# Altium PCB pcb.PcbDoc
Units mil, origin at the board's own origin, x right, y up, seen from the top; angles counter-clockwise.
Board outline 3858 x 2953 mil, 2 copper layers (Top Layer, Bottom Layer); 27 components, 19 nets, 122 pads, 2 vias.
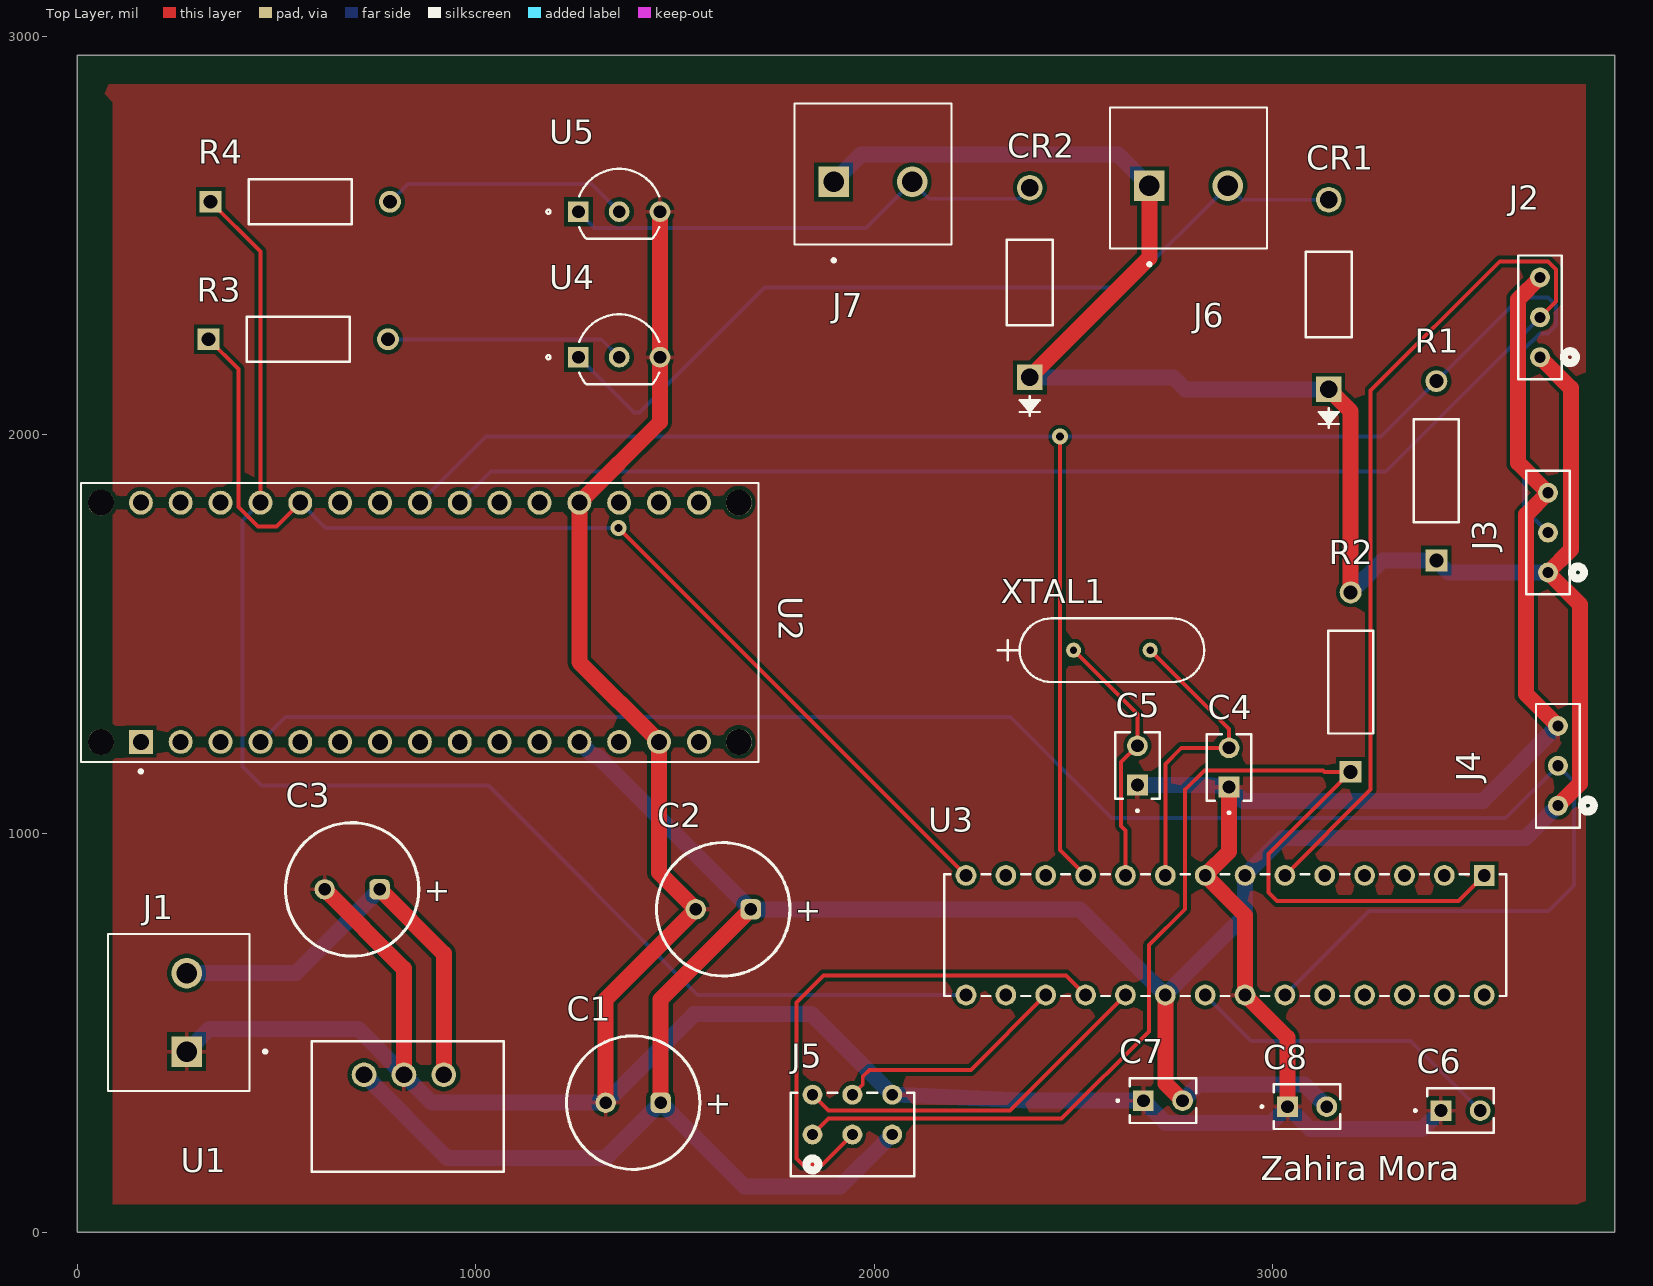
[diagram p0: Top Layer view]
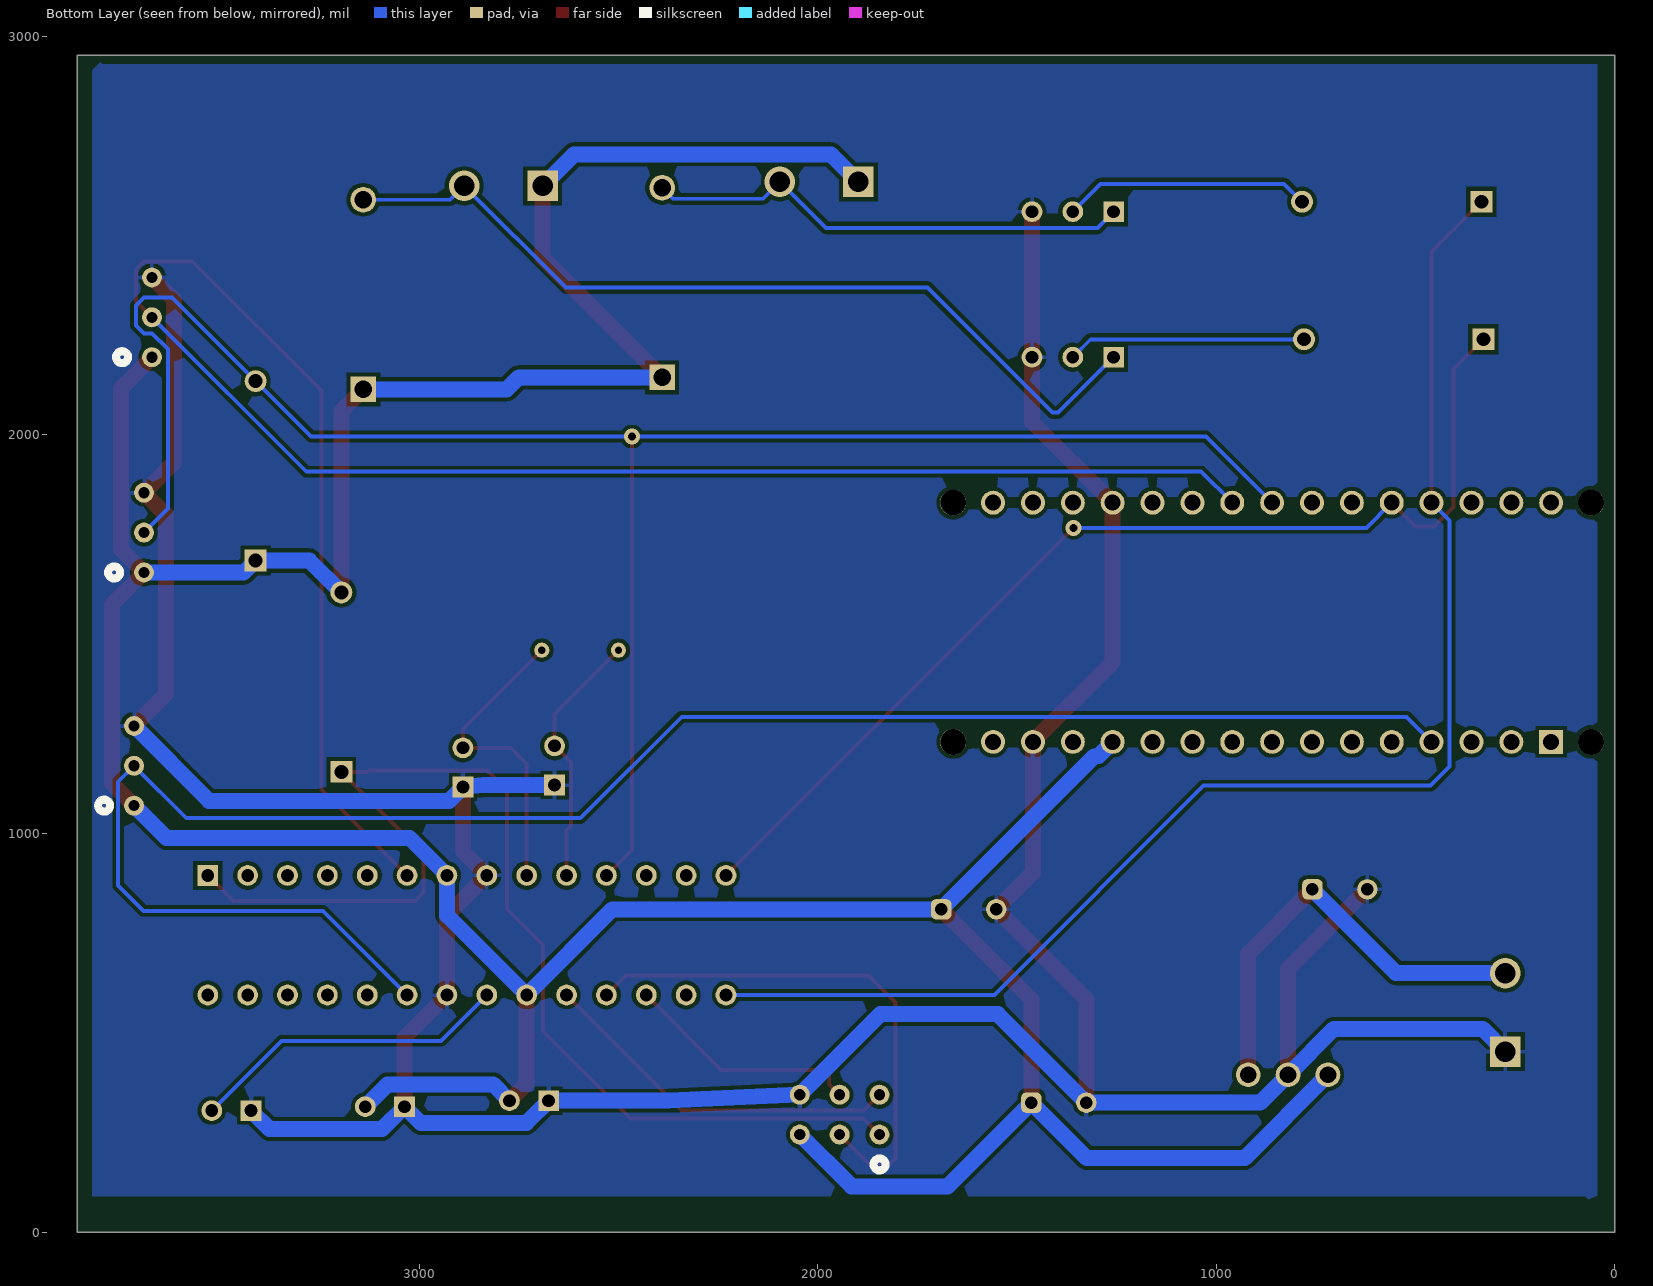
[diagram p1: Bottom Layer view, seen from below]
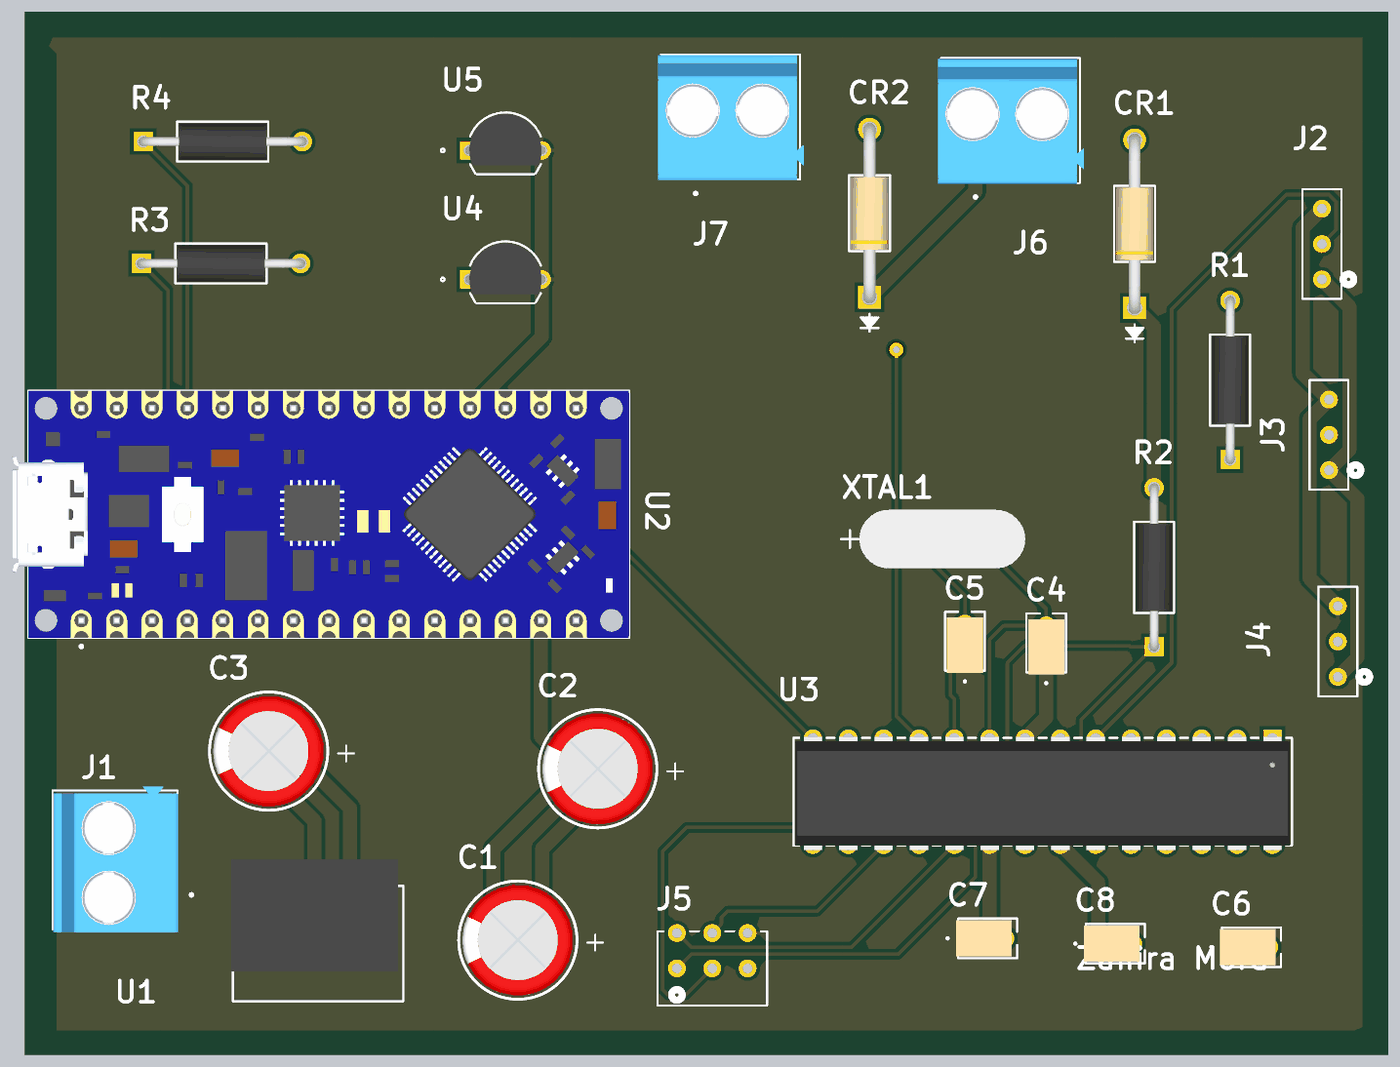
[diagram p2: 3D render of the assembled board from above, using the file's embedded part models]

## Layer stack, top to bottom
Top Solder: solder mask 0.4, Solder Resist, Dk 3.5
Top Layer: signal copper 1.4
Dielectric 1: dielectric 12.6, FR-4, Dk 4.8
Bottom Layer: signal copper 1.4
Bottom Solder: solder mask 0.4, Solder Resist, Dk 3.5

## Board outline
0,0 0,2953 3858,2953 3858,0

## Design rules (kind name [scope] priority, off if disabled: settings)
Clearance [All] p1: gap=10 ignorepadtopadclearanceinfootprint=FALSE
HoleSize [All] p1: absolutevalues=TRUE maxlimit=250 minlimit=12 maxpercent=80.000 minpercent=20.000
MinimumAnnularRing [All] p1: minimumring=8
MinimumSolderMaskSliver [All] p1: minsoldermaskwidth=5
PolygonConnect [All] p1: connectstyle=Relief reliefconductorwidth=10 reliefentries=4 polygonreliefangle="90 Angle" airgapwidth=10
RoutingVias [All] p1: holewidth=20 width=40 viastyle="Through Hole" minholewidth=28 minwidth=50 maxholewidth=28 maxwidth=50
SilkToSilkClearance [All] p1: silktosilkclearance=4
SolderMaskExpansion [All] p1: expansion=4 istentingtop=FALSE
SupplyNets "Schematic Supply Nets_2" [InNet('+12')] p1: voltage=0.000
SupplyNets "Schematic Supply Nets_1" [InNet('+5V')] p2: voltage=0.000
SupplyNets "Schematic Supply Nets" [InNet('GND')] p3: voltage=0.000
Width Width_gnd [InNet('GND')] p1: maxlimit=60 minlimit=24 preferedwidth=40
Width width_5v [InNet('+5V')] p2: maxlimit=60 minlimit=24 preferedwidth=40
Width width_12v [InNet('+12')] p3: maxlimit=60 minlimit=24 preferedwidth=40
Width [All] p4: maxlimit=10 minlimit=10 preferedwidth=10
27 further rules are at their usual default settings.

## Components (designator, comment, footprint, x,y, rotation, side; value= is the part's Value field where it differs from the comment)
C1 "860160274015" WCAP-ATLL_D8H11.5 1395,325 r0 top
C2 "860160274015" WCAP-ATLL_D8H11.5 1621.1,810 r0 top
C3 "860160274015" WCAP-ATLL_D8H11.5 690,860 r0 top
C4 "K104K15X7RF5TL2" K104K15X7RF5TL2_VIS 2890,1116.57 r90 top
C5 "K104K15X7RF5TL2" K104K15X7RF5TL2_VIS 2660,1121.57 r90 top
C6 "100nF" K104K15X7RF5TL2_VIS 3421.57,305 r0 top
C7 "22pF" K104K15X7RF5TL2_VIS 2675,330 r0 top
C8 "22pF" K104K15X7RF5TL2_VIS 3036.57,315 r0 top
CR1 "1N5819 R0" "CR_1N5819 R0_TWS" 3140,2114.41 r90 top
CR2 "1N5819 R0" "CR_1N5819 R0_TWS" 2390,2144.41 r90 top
J1 "TB001-500-P02BE" CUI_TB001-500-P02BE 275,453.15 r90 top
J2 "TS-103-T-A" CON3_1X3_TU_HTS_SAI 3670,2295 r90 top
J3 "TS-103-T-A" CON3_1X3_TU_HTS_SAI 3690,1755 r90 top
J4 "TS-103-T-A" CON3_1X3_TU_HTS_SAI 3715,1170 r90 top
J5 "TD-103-T-A" CON6_2X3_TU_HTS_SAI 1945,295 r0 top
J6 "TB001-500-P02BE" CUI_TB001-500-P02BE 2690,2625 r0 top
J7 "TB001-500-P02BE" CUI_TB001-500-P02BE 1898.15,2635 r0 top
R1 "10K" STA_CF14_STP 3410,1685 r90 top
R2 "10K" STA_CF14_STP 3195,1155 r90 top
R3 "330" STA_CF14_STP 330,2240 r0 top
R4 "330" STA_CF14_STP 335,2585 r0 top
U1 "R-785.0-1.0" R-785.0-1.0_RCP 920,395 r180 top
U2 "ABX00028" MODULE_ABX00028 860,1530 r0 top
U3 "ATMEGA328-PU" 28P3_SPDIP28_SP_MCH 3530,895 r270 top
U4 "P2N2222A" TO-92-3L_5P33X5P2_ONS 1257.64,2195 r0 top
U5 "P2N2222A" TO-92-3L_5P33X5P2_ONS 1257.64,2560 r0 top
XTAL1 "ABL-16.000MHZ-B2" XTAL_ABL-16_ABR 2500,1460 r0 top

## Footprints (in the part's own frame and the unit in brackets; to place one, negate y for a bottom-side part, rotate by r counter-clockwise, add the part's x,y. Pads: shape width x height; smd on the part's side, far side on the other; paste and mask are expansions set on the pad)
28P3_SPDIP28_SP_MCH [mil]
  rect 52x52 hole 32 paste-99999 mask+0: 1(0,0)
  round 52 hole 32 paste-99999 mask+0: 2(0,-100) 3(0,-200) 4(0,-300) 5(0,-400) 6(0,-500) 7(0,-600) 8(0,-700) 9(0,-800) 10(0,-900) 11(0,-1000) 12(0,-1100) 13(0,-1200) 14(0,-1300) 15(300,-1300) 16(300,-1200) 17(300,-1100) 18(300,-1000) 19(300,-900) 20(300,-800) 21(300,-700) 22(300,-600) 23(300,-500) 24(300,-400) 25(300,-300) 26(300,-200) 27(300,-100) 28(300,0)
  silkscreen extent -3,-1355 303,55, body extent -5,-1350 314,50, height 205
CON3_1X3_TU_HTS_SAI [mil]
  round 50 / inner round 60 / far side round 50 hole 28 paste-99999 mask+0: 1(-100,0) 2(0,0) 3(100,0)
  silkscreen extent -155,-90 155,55
CON6_2X3_TU_HTS_SAI [mil]
  round 50 / inner round 60 / far side round 50 hole 28 paste-99999 mask+0: 1(-100,-50) 2(-100,50) 3(0,-50) 4(0,50) 5(100,-50) 6(100,50)
  silkscreen extent -155,-155 155,55
"CR_1N5819 R0_TWS" [mil]
  rect 64x64 hole 44 paste-99999 mask+0: 1(0,0)
  round 64 hole 44 paste-99999 mask+0: 2(475.59,0)
  silkscreen extent -97,-58 345,58, body extent -17,-53 493,53, height 106
CUI_TB001-500-P02BE [mm]
  rect 1.95x1.95 / inner round 1.95 / far side rect 1.95x1.95 hole 1.3 mask+0.102: 1(0,0)
  round 1.95 hole 1.3 mask+0.102: 2(5,0)
  silkscreen extent -2.5,-5.1 7.5,5, body extent -2.71,-4.05 7.79,4.95, height 12.5
K104K15X7RF5TL2_VIS [mil]
  rect 52x52 hole 32 paste-99999 mask+0: 1(0,0)
  round 52 hole 32 paste-99999 mask+0: 2(98.43,0)
  silkscreen extent -67,-56 133,56, body extent -40,-51 117,51, height 157
MODULE_ABX00028 [mil]
  rect 60x60 / inner round 60 / far side rect 60x60 hole 40: 1(-700,-300)
  round 60 hole 40: 2(-600,-300) 3(-500,-300) 4(-400,-300) 5(-300,-300) 6(-200,-300) 7(-100,-300) 8(0,-300) 9(100,-300) 10(200,-300) 11(300,-300) 12(400,-300) 13(500,-300) 14(600,-300) 15(700,-300) 16(700,300) 17(600,300) 18(500,300) 19(400,300) 20(300,300) 21(200,300) 22(100,300) 23(0,300) 24(-100,300) 25(-200,300) 26(-300,300) 27(-400,300) 28(-500,300) 29(-600,300) 30(-700,300)
  round 65 hole 65 unplated: ""(-800,-300) ""(-800,300) ""(800,-300) ""(800,300)
  silkscreen extent -850,-378 850,350, body extent -895,-350 850,350, height 236
R-785.0-1.0_RCP [mil]
  round 62 hole 42 paste-99999 mask+0: 1(0,0) 2(100,0) 3(200,0)
  silkscreen extent -151,-84 331,243, body extent -136,-159 336,159, height 421
STA_CF14_STP [mil]
  rect 55x55 / inner round 60 / far side rect 55x55 hole 35 paste-99999 mask+0: 1(0,0)
  round 55 / inner round 60 / far side round 55 hole 35 paste-99999 mask+0: 2(450,0)
  silkscreen extent 96,-56 354,57, body extent -12,-51 462,51, height 103
TO-92-3L_5P33X5P2_ONS [mil]
  rect 52x52 / inner round 60 / far side rect 52x52 hole 32 paste-99999 mask+0: 1(0,0)
  round 52 / inner round 60 / far side round 52 hole 32 paste-99999 mask+0: 2(102.36,0) 3(204.72,0)
  silkscreen extent -80,-68 203,107, body extent -11,-43 216,102, height 245
WCAP-ATLL_D8H11.5 [mm] "Aluminum Electrolytic Capacitors, 8x11.5mm"
  rrect50% 1.3x1.3 hole 0.8: 1(1.75,0)
  round 1.3 hole 0.8: 2(-1.75,0)
  silkscreen extent -4.25,-4.25 4.25,4.25, body extent -3.99,-4 4,4, height 11.81
XTAL_ABL-16_ABR [mil]
  round 38 hole 18 paste-99999 mask+0: 1(0,0) 2(192.13,0)
  silkscreen extent -190,-80 328,80, body extent -137,-82 330,82, height 138

## Part data
C1 C2: library part CMP-03913-54007388-2, "100uF", Capacitance=270µF, Case/Package=Radial, Leakage Current=27µA, Max Operating Temperature=105°C, Min Operating Temperature=-55°C, Ripple Current=420mA, Tolerance=20%, Voltage Rating=10V, Diameter=8mm, Height - Seated (Max)=13.0048mm, Impedance=530mΩ, Lead Pitch=3.5052mm, Length=11.5mm, Life (Hours)=7000hours, Mount="Through Hole", Packaging="Tape & Box (TB)", Pitch=3.5mm, Polarity=Polar, RoHS=Compliant
C3: library part CMP-03913-54007388-2, "47uF", Capacitance=270µF, Case/Package=Radial, Leakage Current=27µA, Max Operating Temperature=105°C, Min Operating Temperature=-55°C, Ripple Current=420mA, Tolerance=20%, Voltage Rating=10V, Diameter=8mm, Height - Seated (Max)=13.0048mm, Impedance=530mΩ, Lead Pitch=3.5052mm, Length=11.5mm, Life (Hours)=7000hours, Mount="Through Hole", Packaging="Tape & Box (TB)", Pitch=3.5mm, Polarity=Polar, RoHS=Compliant
C4 C5: "K 50V 100nF Â± 10 % X7R REEL e3", Manufacturer_Name=Vishay, Copyright="Copyright (C) 2025 Ultra Librarian. All rights reserved.", Manufacturer_Part_Number=K104K15X7RF5TL2, Type="Ceramic Capacitor"
C6: library part K104K15X7RF5TL2, "K 50V 100nF Â± 10 % X7R REEL e3", Manufacturer_Name=Vishay, Copyright="Copyright (C) 2025 Ultra Librarian. All rights reserved.", Manufacturer_Part_Number=K104K15X7RF5TL2, Type="Ceramic Capacitor"
C7 C8: library part K104K15X7RF5TL2, Manufacturer_Name=Vishay, Copyright="Copyright (C) 2025 Ultra Librarian. All rights reserved.", Manufacturer_Part_Number=K104K15X7RF5TL2, Type="Ceramic Capacitor"
CR1 CR2: "Description", Manufacturer_Name="Taiwan Semiconductor", Copyright="Copyright (C) 2026 Ultra Librarian. All rights reserved.", Manufacturer_Part_Number="1N5819 R0"
J1 J6 J7: "2~24 Poles, Screw Type, Horizontal, 5.0 Pitch, 22~12 (AWG), Terminal Block Connector", Package=None, Check_prices=https://www.snapeda.com/parts/TB001-500-P02BE/Same+Sky/view-part/?ref=eda, MF="Same Sky", MP=TB001-500-P02BE, SnapEDA_Link=https://www.snapeda.com/parts/TB001-500-P02BE/Same+Sky/view-part/?ref=snap
J2 J3 J4 J5: "Description", Manufacturer_Name="Samtec Inc", Copyright="Copyright (C) 2025 Ultra Librarian. All rights reserved.", RefDes=RefDes, Type=Type
  J2 J3 J4: Manufacturer_Part_Number=TS-103-T-A
  J5: Manufacturer_Part_Number=TD-103-T-A
R1 R2 R4: library part CF14JT10K0, "Description", Manufacturer_Name="Stackpole International", Copyright="Copyright (C) 2025 Ultra Librarian. All rights reserved.", Manufacturer_Part_Number=CF14JT10K0
R3: library part CF14JT10K0, Manufacturer_Name="Stackpole International", Copyright="Copyright (C) 2025 Ultra Librarian. All rights reserved.", Manufacturer_Part_Number=CF14JT10K0
U1: "No Description Available", Manufacturer_Name="Recom Power", Copyright="Copyright (C) 2026 Ultra Librarian. All rights reserved.", Manufacturer_Part_Number=R-785.0-1.0, RefDes=RefDes, Type=Type
U2: "Arduinoâ€™s 5V compatible board in the smallest available form factor: 45x18mm!", Package=None, Availability="Not in stock", Check_prices=https://www.snapeda.com/parts/Arduino%20Nano%20Every/Arduino/view-part/?ref=eda, MF=Arduino, MP="Arduino Nano Every", Price=None, SnapEDA_Link=https://www.snapeda.com/parts/Arduino%20Nano%20Every/Arduino/view-part/?ref=snap
U3: "Description", Manufacturer_Name=Microchip, Copyright="Copyright (C) 2026 Ultra Librarian. All rights reserved.", Manufacturer_Part_Number=ATMEGA328-PU, RefDes=RefDes, Type=Type
U4 U5: "Description", Manufacturer_Name=onsemi, Copyright="Copyright (C) 2025 Ultra Librarian. All rights reserved.", Manufacturer_Part_Number=P2N2222A, RefDes=RefDes, Type=Type
XTAL1: "Description", Manufacturer_Name=Abracon, Copyright="Copyright (C) 2026 Ultra Librarian. All rights reserved.", Manufacturer_Part_Number=ABL-16.000MHZ-B2

## Via types
v1: diameter 40, hole 20, Top Layer to Bottom Layer, 2 vias

## Nets (pads, with @x,y where several pads share a name; then routed paths per layer and width w, separated by ;. In a path a pad name is that pad's centre, name@x,y a point inside that pad or via, vN(x,y) a via of type N, cw(c..) or ccw(c..) an arc to the next point about the centre after c; other vN are vias at no path point)
+5V: C1.1 C2.1 C7.2 C8.2 CR1.1 CR2.1 J2.1 J3.1 J4.1 J5.5 J6.1 J7.1 R1.1 R2.2 U1.3 U2.12 U3.7 U3.20 | length 10376.8
  Top Layer w40: C1.1 1463.9,583.9 C2.1 ; CR2.1 2690,2444.41 J6.1 ; U3.20 2730,373.43 C7.2 ; CR1.1 3195,2059.41 R2.2 ; J2.1 3747.5,2117.5 3747.5,1712.5 J3.1 3770,1575 3770,1125 J4.1
  Bottom Layer w40: U1.3 929,186 1324.9,186 C1.1 1673.9,115 1915,115 J5.5 ; U2.12 1296,1194 1306,1194 C2.1 2515,810 U3.20 2930,795 U3.7 3024,989 3634,989 J4.1 ; J7.1 1967.15,2704 2611,2704 J6.1 ; CR2.1 2750,2144.41 2780,2114.41 CR1.1 ; C7.2 2814.43,371 3079,371 C8.2 ; R2.2 3275,1685 R1.1 3440,1655 J3.1
+12: C3.1 J1.2 U1.1 | length 1102.6
  Top Layer w40: C3.1 920,698.9 U1.1
  Bottom Layer w40: J1.2 548.9,650 C3.1
GND: C1.2 C2.2 C3.2 C4.1 C5.1 C6.1 C7.1 C8.1 J1.1 J2.3 J3.3 J4.3 J5.6 U1.2 U2.14 U2.19 U3.8 U3.22 U4.3 U5.3 | length 9880.2
  Top Layer w40: C3.2 820,661.1 U1.2 ; C1.2 1326.1,583.9 C2.2 1460,902.2 U2.14 1260,1430 U2.19 1462.36,2032.36 U4.3 U5.3 ; C4.1 2890,955 U3.8 2930,795 U3.22 3036.57,488.43 C8.1 ; J2.3 3615,2340 3615,1930 J3.3 3635,1800 3635,1350 J4.3
  Bottom Layer w40: J1.1 331.85,510 705,510 U1.2 890,325 C1.2 1548.1,547 1843,547 J5.6 2375,330 C7.1 2731,274 2995.57,274 C8.1 3092.57,259 3375.57,259 C6.1 ; C5.1 2839,1121.57 C4.1 2924.57,1082 3527,1082 J4.3
NetC4_2: C4.2 U3.9 XTAL1.2 | length 783.5
  Top Layer w10: XTAL1.2 2890,1262.13 C4.2 2770,1215 2730,1175 U3.9
NetC5_2: C5.2 U3.10 XTAL1.1 | length 652.8
  Top Layer w10: XTAL1.1 2660,1300 C5.2 2619,1179 2619,1019 2630,1008 U3.10
NetC6_2: C6.2 U3.21 | length 810.1
  Bottom Layer w10: U3.21 2945,480 3345,480 C6.2
NetCR1_2: CR1.2 J6.2 U4.1 | length 2190.1
  Bottom Layer w10: U4.1 1396.64,2056 1411,2056 1725,2370 2631.85,2370 J6.2 2921.85,2590 CR1.2
NetCR2_2: CR2.2 J7.2 U5.1 | length 1226.4
  Bottom Layer w10: U5.1 1298.64,2519 1979,2519 J7.2 2137.5,2592.5 2362.5,2592.5 CR2.2
NetJ2_2: J2.2 U2.22 U3.6 | length 4951.7
  Top Layer w10: U3.6 3245,1110 3245,2111 3569,2435 3690,2435 3710,2415 3710,2335 J2.2
  Bottom Layer w10: U2.22 1038,1908 3283,1908 J2.2
NetJ3_2: J3.2 R1.2 U2.23 U3.11 | length 4838.8
  Top Layer w10: v1(2466,1996) 2466,959 U3.11
  Bottom Layer w10: U2.23 1026,1996 v1(2466,1996) 3271,1996 R1.2 3620,2345 3690,2345 3710,2325 3710,2275 3690,2255 3670,2255 3630,2215 3630,1815 J3.2
NetJ4_2: J4.2 U2.4 U3.23 | length 4596
  Bottom Layer w10: U2.4 523,1293 2341,1293 2595,1039 3584,1039 J4.2 3755,1130 3755,870 3691,806 3241,806 U3.23
NetJ5_1: J5.1 R2.1 U3.1 | length 2995.6
  Top Layer w10: J5.1 1885,285 2470,285 2689,504 2689,720 2780,811 2780,1110 2828,1158 3126,1158 3129,1155 R2.1 2989,949 2989,852 3010,831 3466,831 U3.1
NetJ5_2: J5.2 U3.19 | length 921.7
  Top Layer w10: J5.2 1885,305 2340,305 U3.19
NetJ5_3: J5.3 U3.18 | length 1341.7
  Top Layer w10: J5.3 1870,170 1820,170 1805,185 1805,576 1873,644 2481,644 U3.18
NetJ5_4: J5.4 U3.17 | length 599.7
  Top Layer w10: J5.4 1971.03,371.03 1971.03,390 1988.03,407 2242,407 U3.17
NetR3_1: R3.1 U2.26 U3.14 | length 2709.5
  Top Layer w10: R3.1 405,2165 405,1819 454,1770 500,1770 U2.26 ; v1(1358,1767) U3.14
  Bottom Layer w10: U2.26 623,1767 v1(1358,1767)
NetR3_2: R3.2 U4.2 | length 598.6
  Bottom Layer w10: R3.2 1315,2240 U4.2
NetR4_1: R4.1 U2.27 U3.15 | length 3539.8
  Top Layer w10: R4.1 460,2460 U2.27
  Bottom Layer w10: U2.27 415,1785 415,1168 463,1120 1032,1120 1557,595 U3.15
NetR4_2: R4.2 U5.2 | length 622.6
  Bottom Layer w10: R4.2 830,2630 1290,2630 U5.2
pads on no net: U2. U2.1 U2.2 U2.3 U2.5 U2.6 U2.7 U2.8 U2.9 U2.10 U2.11 U2.13 U2.15 U2.16 U2.17 U2.18 U2.20 U2.21 U2.24 U2.25 U2.28 U2.29 U2.30 U3.2 U3.3 U3.4 U3.5 U3.12 U3.13 U3.16 U3.24 U3.25 U3.26 U3.27 U3.28

## Polygon pours and split planes (outlines as drawn)
GND on Top Layer "GND_L01_P000" (solid, pour order 0): 3785,2880 3785,65 3775,55 3760,70 90,70 90,2835 55,2870 65,2880 3710,2880 65,2880 3710,2880
GND on Bottom Layer "GND_L02_P001" (solid, pour order 1): 3795,2930 3800,2935 3820,2915 3820,90 75,90 45,60 45,2930

## Silkscreen, mask and mechanical layers (free items; w line width, h text height)
Top Overlay:
  text "Zahira Mora" at 2970,130 h60
Mechanical 1:
  the board outline again, w10

## Text inside footprints (layer, text, board x,y; h text height)
C1: Top Overlay "+" at 1574.13,295.47 h59.06
C2: Top Overlay "+" at 1800.24,780.47 h59.06
C3: Top Overlay "+" at 869.13,830.47 h59.06
J2: Top 3D Body "RefDes2" at 3695,2207.5 h50 r90
J5: Top 3D Body "RefDes2" at 1857.5,270 h50
R1: Top 3D Body "RefDes2" at 3435,1822.5 h50 r90
R2: Top 3D Body "RefDes2" at 3220,1292.5 h50 r90
R3: Top 3D Body "RefDes2" at 467.5,2215 h50
R4: Top 3D Body "RefDes2" at 472.5,2560 h50
U1: Top 3D Body "*" at 1068.34,420 h50 r180
U3: Top 3D Body "*" at 3505,895 h50 r270
U4: Top 3D Body "RefDes2" at 1272.5,2170 h50
U5: Top 3D Body "RefDes2" at 1272.5,2535 h50